# Altium PCB VCB2025_rev0.PcbDoc (part 2 of 3)
Units mm, origin at the board's own origin, x right, y up, seen from the top; angles counter-clockwise.
Board outline 146 x 96 mm, 2 copper layers (Top Layer, Bottom Layer); 173 components, 126 nets, 592 pads, 876 vias.
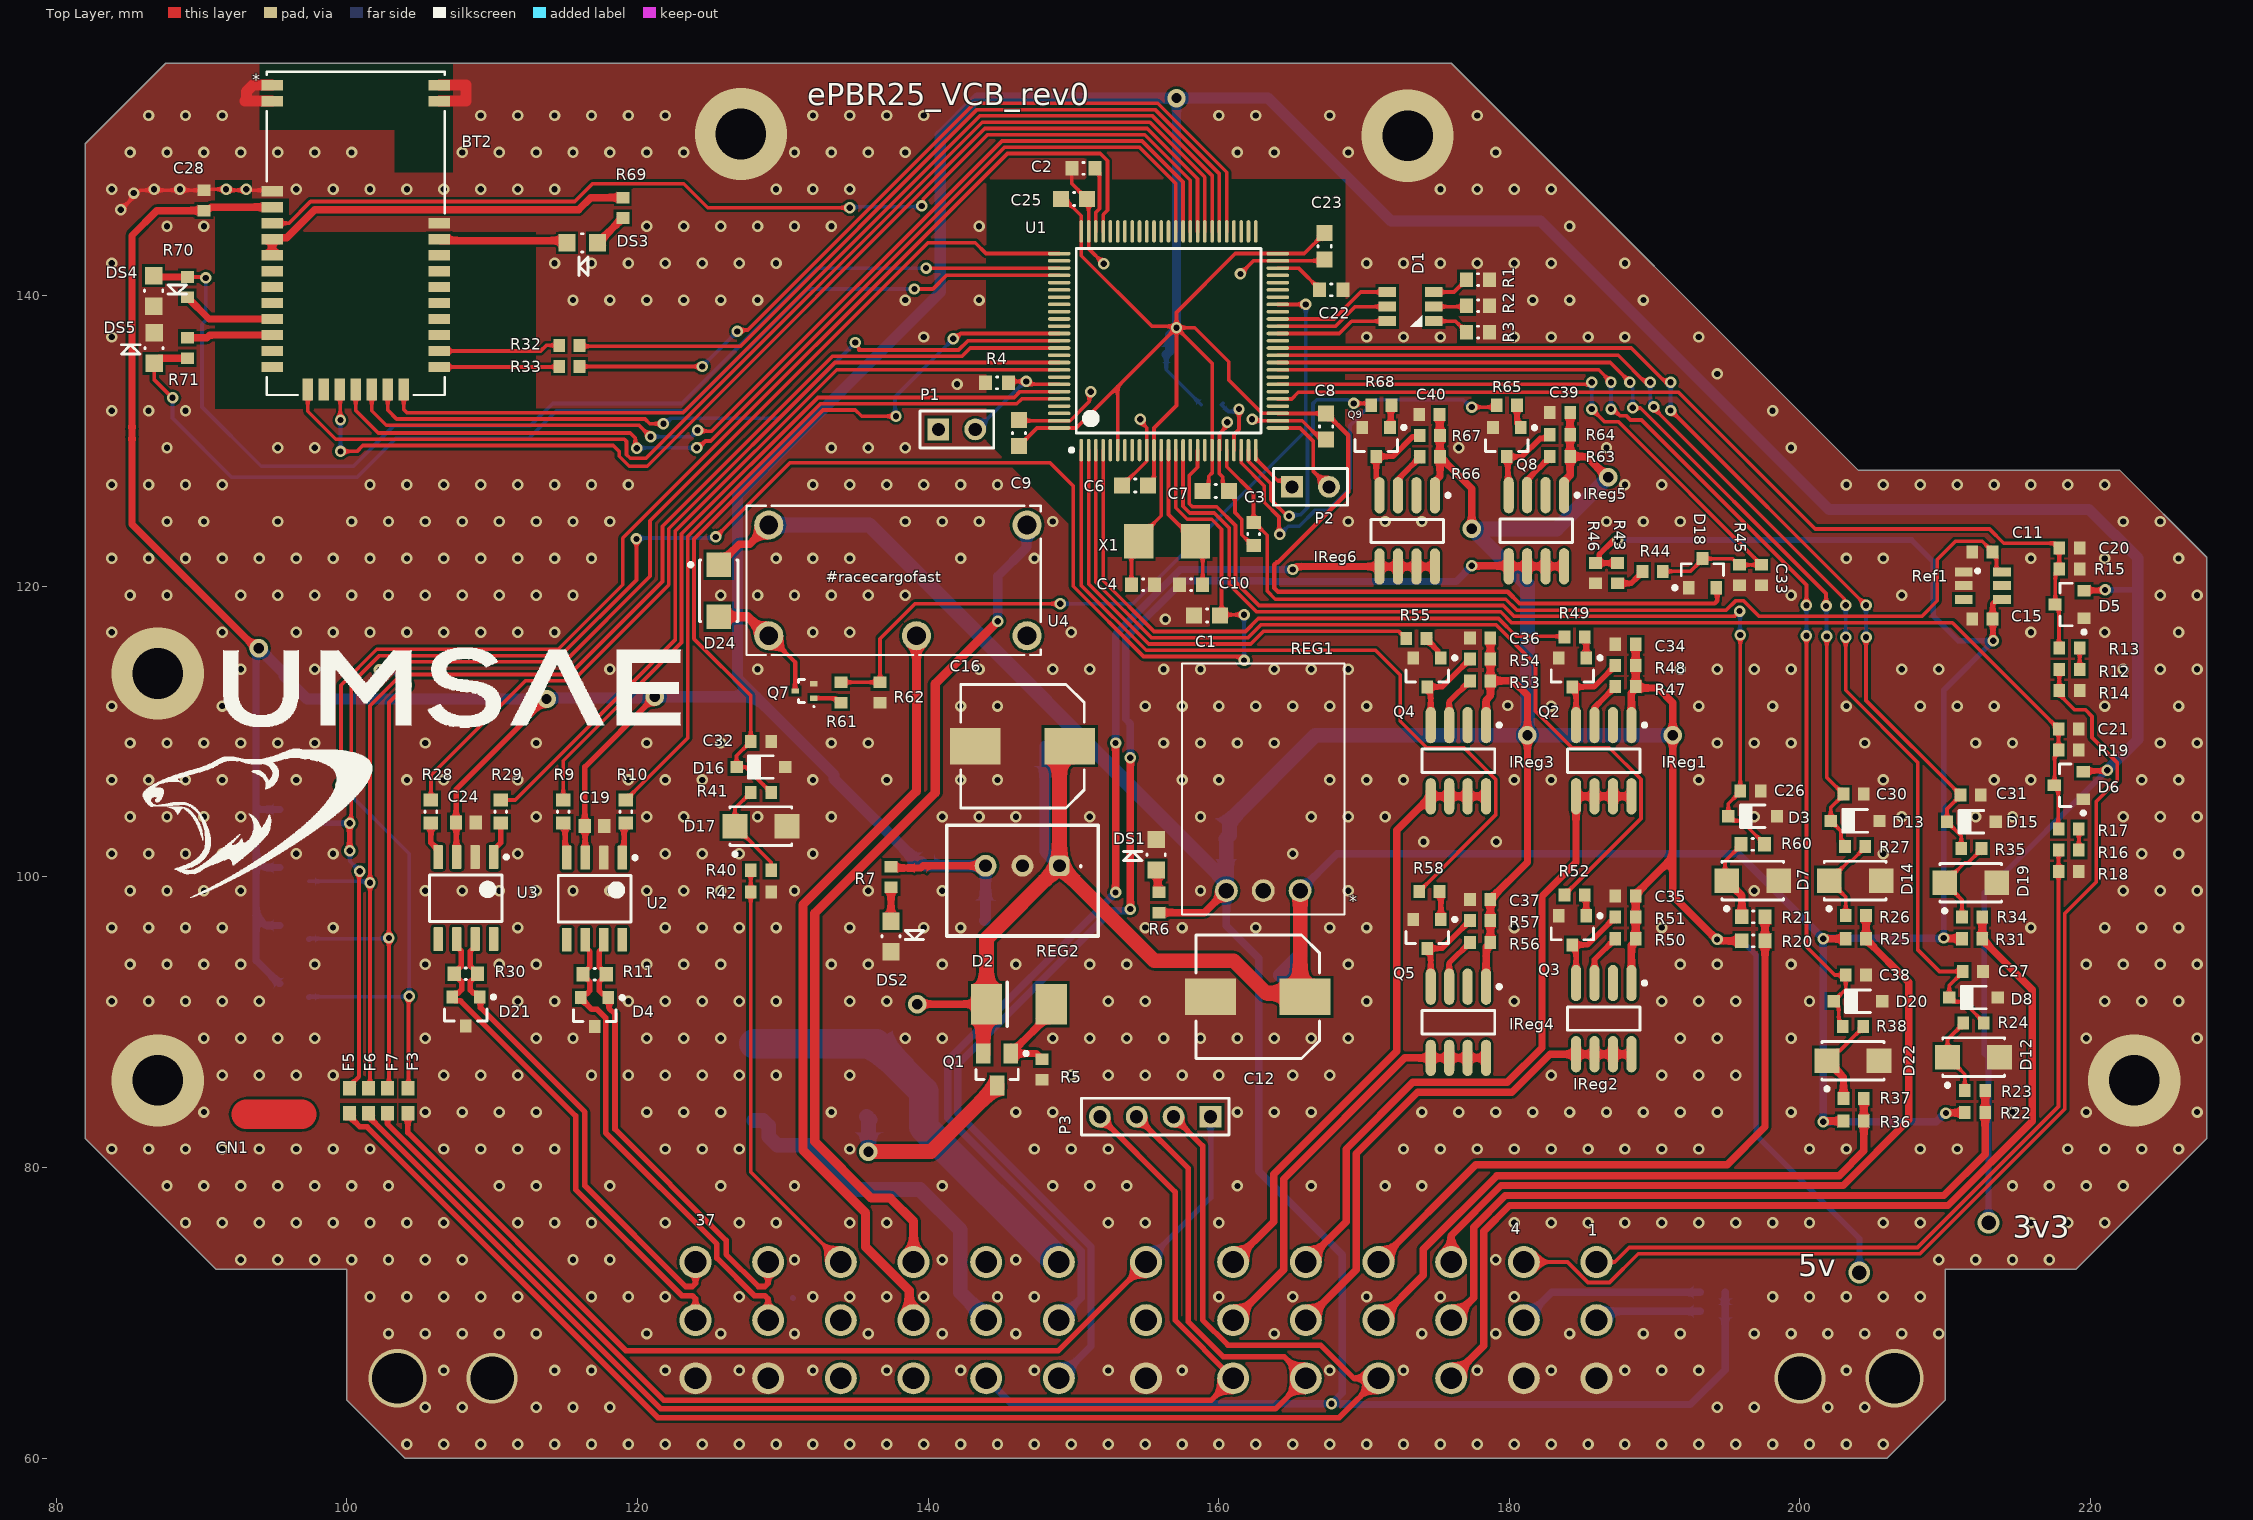
[diagram p0: Top Layer view]

## Part data (continued)
R6: "Resistor", Manufacturer=Yageo, Manufacturer Part Number=RC0603JR-07180RL, Operating Temperature="-55°C ~ 155°C", Package / Case="0603 (1608 Metric)", Power (Watts)="0.1W, 1/10W", Resistance (Ohms)=180, Supplier Device Package=0603, Supplier Part Number 1=311-180GRCT-ND, Temperature Coefficient=±100ppm/°C, Tolerance=±5%, Category=Resistors, ComponentLink1Description=http://www.yageo.com/NewPortal/yageodocoutput?fileName=/pdf/R-Chip/PYu-RC_Group_51_RoHS_L_4.pdf, ComponentLink1URL=http://www.yageo.com/NewPortal/yageodocoutput?fileName=/pdf/R-Chip/PYu-RC_Group_51_RoHS_L_4.pdf, Composition="Thick Film", Failure Rate=-, Features="Moisture Resistant", Height - Seated (Max)="0.022\" (0.55mm)", Number of Terminations=2, Packaging="Cut Tape (CT)", Part Status=Active, Pricing 1="1=0.16, 10=0.016, 25=0.0112, 50=0.0084, 100=0.0062, 250=0.0048, 500=0.00382, 1000=0.00281 (CAD)", RoHS="RoHS Compliant", Size / Dimension="0.063\" L x 0.031\" W (1.60mm x 0.80mm)", Stock 1=201936, Supplier 1=Digi-Key
R7: "Resistor", Manufacturer=Yageo, Manufacturer Part Number=RC0603JR-0782RL, Operating Temperature="-55°C ~ 155°C", Package / Case="0603 (1608 Metric)", Power (Watts)="0.1W, 1/10W", Resistance (Ohms)=82, Supplier Device Package=0603, Supplier Part Number 1=311-82GRCT-ND, Temperature Coefficient=±100ppm/°C, Tolerance=±5%, Category=Resistors, ComponentLink1Description=http://www.yageo.com/NewPortal/yageodocoutput?fileName=/pdf/R-Chip/PYu-RC_Group_51_RoHS_L_4.pdf, ComponentLink1URL=http://www.yageo.com/NewPortal/yageodocoutput?fileName=/pdf/R-Chip/PYu-RC_Group_51_RoHS_L_4.pdf, Composition="Thick Film", Failure Rate=-, Features="Moisture Resistant", Height - Seated (Max)="0.022\" (0.55mm)", Number of Terminations=2, Packaging="Cut Tape (CT)", Part Status=Active, Pricing 1="1=0.16, 10=0.016, 25=0.0112, 50=0.0084, 100=0.0062, 250=0.0048, 500=0.00382, 1000=0.00281 (CAD)", RoHS="RoHS Compliant", Size / Dimension="0.063\" L x 0.031\" W (1.60mm x 0.80mm)", Stock 1=72049, Supplier 1=Digi-Key
R8: library part CMP-1014-00050-1, "100R 0.25W 5% 1206 (3216 Metric)  SMD", Case-EIA=1206, Case-Metric=3216, Power="0.25 W", Tolerance="5 %", Technology=SMT
R9 R10 R28 R29: library part CMP-1012-00034-1, "22R 0.1W 5% 0603 (1608 Metric)  SMD", Case-EIA=0603, Case-Metric=1608, Power="0.1 W", Tolerance="5 %", Technology=SMT
R11 R30: library part CMP-1012-00052-1, "120R 0.1W 5% 0603 (1608 Metric)  SMD", Case-EIA=0603, Case-Metric=1608, Power="0.1 W", Tolerance="5 %", Technology=SMT
R12 R16: "Resistor", Manufacturer=Yageo, Manufacturer Part Number=RT0603BRD073K9L, Operating Temperature="-55°C ~ 155°C", Package / Case="0603 (1608 Metric)", Power (Watts)="0.1W, 1/10W", Resistance (Ohms)=3.9k, Supplier Device Package=0603, Supplier Part Number 1=YAG1656CT-ND, Temperature Coefficient=±25ppm/°C, Tolerance=±0.1%, Category=Resistors, ComponentLink1Description=http://www.yageo.com/documents/recent/PYu-RT_1-to-0.05_RoHS_L_6.pdf, ComponentLink1URL=http://www.yageo.com/documents/recent/PYu-RT_1-to-0.05_RoHS_L_6.pdf, Composition="Thin Film", Failure Rate=-, Features="Moisture Resistant", Height - Seated (Max)="0.022\" (0.55mm)", Number of Terminations=2, Packaging="Cut Tape (CT)", Part Status=Active, Pricing 1="1=0.55, 10=0.464, 25=0.3376, 50=0.2446, 100=0.1814, 250=0.1392, 500=0.10966, 1000=0.07592 (CAD)", RoHS="RoHS Compliant", Size / Dimension="0.063\" L x 0.031\" W (1.60mm x 0.80mm)", Stock 1=10688, Supplier 1=Digi-Key
R13 R17: "Resistor", Manufacturer=Yageo, Manufacturer Part Number=RT0603BRD071K3L, Operating Temperature="-55°C ~ 155°C", Package / Case="0603 (1608 Metric)", Power (Watts)="0.1W, 1/10W", Resistance (Ohms)=1.3k, Supplier Device Package=0603, Supplier Part Number 1=YAG1565CT-ND, Temperature Coefficient=±25ppm/°C, Tolerance=±0.1%, Category=Resistors, ComponentLink1Description=http://www.yageo.com/documents/recent/PYu-RT_1-to-0.05_RoHS_L_6.pdf, ComponentLink1URL=http://www.yageo.com/documents/recent/PYu-RT_1-to-0.05_RoHS_L_6.pdf, Composition="Thin Film", Failure Rate=-, Features="Moisture Resistant", Height - Seated (Max)="0.022\" (0.55mm)", Number of Terminations=2, Packaging="Cut Tape (CT)", Part Status=Active, Pricing 1="1=0.55, 10=0.464, 25=0.3376, 50=0.2446, 100=0.1814, 250=0.1392, 500=0.10966, 1000=0.07592 (CAD)", RoHS="RoHS Compliant", Size / Dimension="0.063\" L x 0.031\" W (1.60mm x 0.80mm)", Stock 1=2236, Supplier 1=Digi-Key
R14 R18 R22 R25 R31 R36 R46: "Resistor", Manufacturer=Yageo, Manufacturer Part Number=RC0603JR-0710KL, Operating Temperature="-55°C ~ 155°C", Package / Case="0603 (1608 Metric)", Power (Watts)="0.1W, 1/10W", Resistance (Ohms)=10k, Supplier Device Package=0603, Supplier Part Number 1=311-10KGRCT-ND, Temperature Coefficient=±100ppm/°C, Tolerance=±5%, Category=Resistors, ComponentLink1Description=http://www.yageo.com/NewPortal/yageodocoutput?fileName=/pdf/R-Chip/PYu-RC_Group_51_RoHS_L_4.pdf, ComponentLink1URL=http://www.yageo.com/NewPortal/yageodocoutput?fileName=/pdf/R-Chip/PYu-RC_Group_51_RoHS_L_4.pdf, Composition="Thick Film", Failure Rate=-, Features="Moisture Resistant", Height - Seated (Max)="0.022\" (0.55mm)", Number of Terminations=2, Packaging="Cut Tape (CT)", Part Status=Active, Pricing 1="1=0.16, 10=0.016, 25=0.0112, 50=0.0084, 100=0.0062, 250=0.0048, 500=0.00382, 1000=0.00281 (CAD)", RoHS="RoHS Compliant", Size / Dimension="0.063\" L x 0.031\" W (1.60mm x 0.80mm)", Stock 1=2936292, Supplier 1=Digi-Key
R15 R19 R45: "Resistor", Manufacturer=Yageo, Manufacturer Part Number=RT0603BRD0710KL, Operating Temperature="-55°C ~ 155°C", Package / Case="0603 (1608 Metric)", Power (Watts)="0.1W, 1/10W", Resistance (Ohms)=10k, Supplier Device Package=0603, Supplier Part Number 1=YAG1236CT-ND, Temperature Coefficient=±25ppm/°C, Tolerance=±0.1%, Category=Resistors, ComponentLink1Description=http://www.yageo.com/documents/recent/PYu-RT_1-to-0.05_RoHS_L_6.pdf, ComponentLink1URL=http://www.yageo.com/documents/recent/PYu-RT_1-to-0.05_RoHS_L_6.pdf, Composition="Thin Film", Failure Rate=-, Features="Moisture Resistant", Height - Seated (Max)="0.022\" (0.55mm)", Number of Terminations=2, Packaging="Cut Tape (CT)", Part Status=Active, Pricing 1="1=0.5, 10=0.42, 25=0.3048, 50=0.2212, 100=0.164, 250=0.12592, 500=0.0992, 1000=0.06867 (CAD)", RoHS="RoHS Compliant", Size / Dimension="0.063\" L x 0.031\" W (1.60mm x 0.80mm)", Stock 1=2958, Supplier 1=Digi-Key
R20 R21 R60: library part CMP-26527-002098-1, "10kΩ ±5% 0.1W 0603 Thick Film Chip Resistor AEC-Q200 compliant", Case Code (Imperial)=0603, Case Code (Metric)=1608, Max Operating Temperature=155°C, Max Power Dissipation=100mW, Min Operating Temperature=-55°C, Resistance=10kR, Resistor Type="Thick Film", Temperature Coefficient=100ppm/°C, Tolerance=5%, Case/Package=0603, Construction=Rectangular, Contact Plating=Tin, Depth=0.8mm, Features="Automotive AEC-Q200", Height=0.022inch, Lead Free="Lead Free", Length=1.55mm, Military Standard=Not, Mount="Surface Mount", Number of Terminations=2, Packaging="Tape and Reel", Power Rating=100mW, Radiation Hardening=No, Series=RMCF, Size Code=0603, Width=0.031inch
R23 R24 R26 R27 R34 R35 R37 R38: "Resistor", Manufacturer=Yageo, Manufacturer Part Number=RC0603JR-075K1L, Operating Temperature="-55°C ~ 155°C", Package / Case="0603 (1608 Metric)", Power (Watts)="0.1W, 1/10W", Resistance (Ohms)=5.1k, Supplier Device Package=0603, Supplier Part Number 1=311-5.1KGRCT-ND, Temperature Coefficient=±100ppm/°C, Tolerance=±5%, Category=Resistors, ComponentLink1Description=http://www.yageo.com/NewPortal/yageodocoutput?fileName=/pdf/R-Chip/PYu-RC_Group_51_RoHS_L_4.pdf, ComponentLink1URL=http://www.yageo.com/NewPortal/yageodocoutput?fileName=/pdf/R-Chip/PYu-RC_Group_51_RoHS_L_4.pdf, Composition="Thick Film", Failure Rate=-, Features="Moisture Resistant", Height - Seated (Max)="0.022\" (0.55mm)", Number of Terminations=2, Packaging="Cut Tape (CT)", Part Status=Active, Pricing 1="1=0.16, 10=0.016, 25=0.0112, 50=0.0084, 100=0.0062, 250=0.0048, 500=0.00382, 1000=0.00281 (CAD)", RoHS="RoHS Compliant", Size / Dimension="0.063\" L x 0.031\" W (1.60mm x 0.80mm)", Stock 1=782184, Supplier 1=Digi-Key
R32 R33 R69 R70 R71: "Resistor", Manufacturer=Yageo, Manufacturer Part Number=RC0603JR-0722RL, Operating Temperature="-55°C ~ 155°C", Package / Case="0603 (1608 Metric)", Power (Watts)="0.1W, 1/10W", Resistance (Ohms)=22, Supplier Device Package=0603, Supplier Part Number 1=311-22GRCT-ND, Temperature Coefficient=±100ppm/°C, Tolerance=±5%, Category=Resistors, ComponentLink1Description=http://www.yageo.com/NewPortal/yageodocoutput?fileName=/pdf/R-Chip/PYu-RC_Group_51_RoHS_L_4.pdf, ComponentLink1URL=http://www.yageo.com/NewPortal/yageodocoutput?fileName=/pdf/R-Chip/PYu-RC_Group_51_RoHS_L_4.pdf, Composition="Thick Film", Failure Rate=-, Features="Moisture Resistant", Height - Seated (Max)="0.022\" (0.55mm)", Number of Terminations=2, Packaging="Cut Tape (CT)", Part Status=Active, Pricing 1="1=0.16, 10=0.016, 25=0.0112, 50=0.0084, 100=0.0062, 250=0.0048, 500=0.00382, 1000=0.00281 (CAD)", RoHS="RoHS Compliant", Size / Dimension="0.063\" L x 0.031\" W (1.60mm x 0.80mm)", Stock 1=603781, Supplier 1=Digi-Key
R43: "Resistor", Manufacturer=Yageo, Manufacturer Part Number=RT0603BRD0739KL, Operating Temperature="-55°C ~ 155°C", Package / Case="0603 (1608 Metric)", Power (Watts)="0.1W, 1/10W", Resistance (Ohms)=39k, Supplier Device Package=0603, Supplier Part Number 1=YAG1649CT-ND, Temperature Coefficient=±25ppm/°C, Tolerance=±0.1%, Category=Resistors, ComponentLink1Description=http://www.yageo.com/documents/recent/PYu-RT_1-to-0.05_RoHS_L_6.pdf, ComponentLink1URL=http://www.yageo.com/documents/recent/PYu-RT_1-to-0.05_RoHS_L_6.pdf, Composition="Thin Film", Failure Rate=-, Features="Moisture Resistant", Height - Seated (Max)="0.022\" (0.55mm)", Number of Terminations=2, Packaging="Cut Tape (CT)", Part Status=Active, Pricing 1="1=0.55, 10=0.464, 25=0.3376, 50=0.2446, 100=0.1814, 250=0.1392, 500=0.10966, 1000=0.07592 (CAD)", RoHS="RoHS Compliant", Size / Dimension="0.063\" L x 0.031\" W (1.60mm x 0.80mm)", Stock 1=2740, Supplier 1=Digi-Key
R44: "Resistor", Manufacturer=Yageo, Manufacturer Part Number=AT0603BRD072KL, Operating Temperature="-55°C ~ 155°C", Package / Case="0603 (1608 Metric)", Power (Watts)="0.1W, 1/10W", Resistance (Ohms)=2k, Supplier Device Package=0603, Supplier Part Number 1=YAG2112CT-ND, Temperature Coefficient=±25ppm/°C, Tolerance=±0.1%, Category=Resistors, ComponentLink1Description=http://www.yageo.com/documents/recent/PYu-AT_51_RoHS_L-3.pdf, ComponentLink1URL=http://www.yageo.com/documents/recent/PYu-AT_51_RoHS_L-3.pdf, Composition="Thin Film", Failure Rate=-, Features="Anti-Sulfur, Automotive AEC-Q200, Moisture Resistant", Height - Seated (Max)="0.022\" (0.55mm)", Number of Terminations=2, Packaging="Cut Tape (CT)", Part Status=Active, Pricing 1="1=0.59, 10=0.431, 25=0.3188, 50=0.235, 100=0.1725, 250=0.14248, 500=0.11746, 1000=0.08498 (CAD)", RoHS="RoHS Compliant", Size / Dimension="0.063\" L x 0.032\" W (1.60mm x 0.80mm)", Stock 1=1218, Supplier 1=Digi-Key
R47 R50 R53 R56 R63 R66: "Resistor", Manufacturer=Yageo, Manufacturer Part Number=RC0603FR-072RL, Operating Temperature="-55°C ~ 155°C", Package / Case="0603 (1608 Metric)", Power (Watts)="0.1W, 1/10W", Resistance (Ohms)=2, Supplier Device Package=0603, Supplier Part Number 1=311-2.00HRCT-ND, Temperature Coefficient=±200ppm/°C, Tolerance=±1%, Category=Resistors, ComponentLink1Description=http://www.yageo.com/NewPortal/yageodocoutput?fileName=/pdf/R-Chip/PYu-RC_Group_51_RoHS_L_4.pdf, ComponentLink1URL=http://www.yageo.com/NewPortal/yageodocoutput?fileName=/pdf/R-Chip/PYu-RC_Group_51_RoHS_L_4.pdf, Composition="Thick Film", Failure Rate=-, Features="Moisture Resistant", Height - Seated (Max)="0.022\" (0.55mm)", Number of Terminations=2, Packaging="Cut Tape (CT)", Part Status=Active, Pricing 1="1=0.16, 10=0.03, 25=0.022, 50=0.0166, 100=0.0122, 250=0.00936, 500=0.00746, 1000=0.0055 (CAD)", RoHS="RoHS Compliant", Size / Dimension="0.063\" L x 0.031\" W (1.60mm x 0.80mm)", Stock 1=84378, Supplier 1=Digi-Key
R48 R51 R54 R57 R64 R67: "Resistor", Manufacturer=Yageo, Manufacturer Part Number=RC0603JR-07110KL, Operating Temperature="-55°C ~ 155°C", Package / Case="0603 (1608 Metric)", Power (Watts)="0.1W, 1/10W", Resistance (Ohms)=110k, Supplier Device Package=0603, Supplier Part Number 1=311-110KGRCT-ND, Temperature Coefficient=±100ppm/°C, Tolerance=±5%, Category=Resistors, ComponentLink1Description=http://www.yageo.com/NewPortal/yageodocoutput?fileName=/pdf/R-Chip/PYu-RC_Group_51_RoHS_L_4.pdf, ComponentLink1URL=http://www.yageo.com/NewPortal/yageodocoutput?fileName=/pdf/R-Chip/PYu-RC_Group_51_RoHS_L_4.pdf, Composition="Thick Film", Failure Rate=-, Features="Moisture Resistant", Height - Seated (Max)="0.022\" (0.55mm)", Number of Terminations=2, Packaging="Cut Tape (CT)", Part Status=Active, Pricing 1="1=0.16, 10=0.016, 25=0.0112, 50=0.0084, 100=0.0062, 250=0.0048, 500=0.00382, 1000=0.00281 (CAD)", RoHS="RoHS Compliant", Size / Dimension="0.063\" L x 0.031\" W (1.60mm x 0.80mm)", Stock 1=85509, Supplier 1=Digi-Key
Ref1: Current - Cathode=-, Current - Output=10mA, Current - Supply=600µA, Digikey Part Number=LT6654AHS6-3.3#TRMPBFCT-ND, Manufacturer="Linear Technology", Operating Temperature="-40°C ~ 125°C (TA)", Package / Case="SOT-23-6 Thin, TSOT-23-6", Supplier Device Package=TSOT-23-6, Temperature Coefficient=10ppm/°C, Tolerance=±0.05%, Voltage - Input="3.8 V ~ 36 V", Voltage - Output (Min/Fixed)=3.3V, Category="Integrated Circuits (ICs)", ComponentLink1Description=http://www.linear.com/docs/29677, ComponentLink1URL=http://www.linear.com/docs/29677, Digikey Link=http://www.digikey.com/product-detail/en/linear-technology/LT6654AHS6-3.3-TRMPBF/LT6654AHS6-3.3-TRMPBFCT-ND/2485839, Manufacturer Part Number=LT6654AHS6-3.3, Mounting Type="Surface Mount", Noise - 0.1Hz to 10Hz=1.7ppmp-p, Noise - 10Hz to 10kHz=2ppmrms, Output Type=Fixed, Packaging="Cut Tape (CT)", Part Status=Active, Pricing 1="1=9.53, 25=8.508, 100=5.5596, 250=5.1048 (CAD)", Reference Type=Series, RoHS="RoHS Compliant", Stock 1=1315, Supplier 1=Digi-Key, Supplier Part Number 1=LT6654AHS6-3.3#TRMPBFCT-ND, Voltage - Output (Max)=-
REG1: "5V DCDC", Current - Output (Max)=1.5A, Manufacturer="Murata Power Solutions Inc.", Manufacturer Part Number=OKI-78SR-3.3/1.5-W36H-C, Operating Temperature="-40°C ~ 85°C", Package / Case="3-SIP Module", Power (Watts) - Manufacture Series=5W, Supplier Part Number 1=811-2196-5-ND, Voltage - Input (Max)=36V, Voltage - Input (Min)=7V, Voltage - Isolation=-, Voltage - Output 1=5V, Applications="ITE (Commercial)", Category="Power Supplies - Board Mount", ComponentLink1Description=http://power.murata.com/data/power/oki-78sr.pdf, ComponentLink1URL=http://power.murata.com/data/power/oki-78sr.pdf, Efficiency=85.5%, Features=SCP, Mounting Type="Through Hole", Number of Outputs=1, Packaging=Tray, Part Status=Active, Pricing 2="1=6.31, 5=6.248, 10=6.205, 25=6.1168, 50=5.9262, 100=5.5449, 250=5.28716 (CAD)", RoHS="RoHS Compliant", Size / Dimension="0.65\" L x 0.41\" W x 0.30\" H (16.5mm x 10.4mm x 7.6mm)", Stock 2=4108, Supplier 1=Digi-Key, Supplier 2=Digi-Key, Supplier Part Number 2=811-3014-ND, Type="Linear Regulator Replacement", Voltage - Output 2=-, Voltage - Output 3=-
REG2: library part OKI-78SR-5, "3.3V DCDC", Current - Output (Max)=1.5A, Manufacturer="Murata Power Solutions Inc.", Manufacturer Part Number=OKI-78SR-3.3/1.5-W36H-C, Operating Temperature="-40°C ~ 85°C", Package / Case="3-SIP Module", Power (Watts) - Manufacture Series=5W, Supplier Part Number 1=811-2196-5-ND, Voltage - Input (Max)=36V, Voltage - Input (Min)=7V, Voltage - Isolation=-, Voltage - Output 1=3.3V, Applications="ITE (Commercial)", Category="Power Supplies - Board Mount", ComponentLink1Description=http://power.murata.com/data/power/oki-78sr.pdf, ComponentLink1URL=http://power.murata.com/data/power/oki-78sr.pdf, Efficiency=85.5%, Features=SCP, Mounting Type="Through Hole", Number of Outputs=1, Packaging=Tray, Part Status=Active, Pricing 2="1=6.31, 5=6.248, 10=6.205, 25=6.1168, 50=5.9262, 100=5.5449, 250=5.28716 (CAD)", RoHS="RoHS Compliant", Size / Dimension="0.65\" L x 0.41\" W x 0.30\" H (16.5mm x 10.4mm x 7.6mm)", Stock 2=4108, Supplier 1=Digi-Key, Supplier 2=Digi-Key, Supplier Part Number 2=811-3014-ND, Type="Linear Regulator Replacement", Voltage - Output 2=-, Voltage - Output 3=-
U1: library part CMP-0243-00221-1, "ARM Cortex-M4 32-bit MCU+FPU, 512 KB Flash, 128 KB Internal RAM, 81 I/Os, 100-Pin LQFP, -40 to 105 degC, Tray", I/Os (High Current)=81, Operating Frequency(F) (Processor speed) (MHz)=180, Package Description=LQFP100, Package Reference="100-Pin Low Profile Quad Flat Package, Body 14 x 14 mm, Pitch 0.5 mm", Supply Voltage(Vcc) min (V)=1.7, ComponentLink1Description="Manufacturer URL", ComponentLink1URL=http://www.st.com/, ComponentLink2Description=Datasheet, ComponentLink2URL=http://www.st.com/st-web-ui/static/active/en/resource/technical/document/datasheet/DM00141306.pdf, Core="ARM Cortex-M4", D/A Converter=2, DatasheetVersion="Rev. 6", FLASH Size (Prog) (kB)=512, Internal RAM Size (kB)=128, Mounting Technology="Surface Mount", Packing=Tray, PartId=1
U2 U3: library part CMP-0315-00075-2, "3.3 V Can Transceiver, 17 mA, -40 to 85 degC, 8-pin SOIC (D), Green (RoHS & no Sb/Br)", Drivers Per Package=1, Manufacturer="Texas Instruments", Rating=Catalog, Supply Voltage(s)(V)=3.3, Code_JEDEC=MS-012AA, ComponentLink1Description=Datasheet, ComponentLink1URL=http://www.ti.com/general/docs/lit/getliterature.tsp?genericPartNumber=SN65HVD232&fileType=pdf, DatasheetVersion=SLOS346K, Eco-Plan="Green (RoHS & no Sb/Br)", ICC(Max)(mA)=17, Isolated=No, Mounting Technology="Surface Mount", PackageDescription="8-Pin Plastic Small Outline Integrated Circuit, 4.9 x 3.9 mm, Pitch 1.27 mm Pitch", PackageReference=D0008A, PackageVersion="revM, Jun-2011", PartNumber=SN65HVD232DR, Receivers Per Package=1, SubFamily=CAN, Transient Pulse Protection(V)="-25 to 25"
U4: Mfr_Name="Tyco Electronics", Copyright="Copyright (C) 2021 Ultra Librarian. All rights reserved.", Digi-Key_Part_Number_1=PB353-ND, Digi-Key_Part_Number_2=PB353-NDL, Manufacturer_Part_Number=PE014005
X1: library part "8MHz crystal, 7A-8.000MAAJ-T", ESR (Equivalent Series Resistance)="80 Ohm", Frequency=8MHz, Frequency Stability=±30ppm, Load Capacitance=18pF, Manufacturer="TXC CORPORATION", Operating Mode=Fundamental, Operating Temperature="-20°C ~ 70°C", Package / Case="2-SMD, No Lead", Ratings=-, Supplier Part Number 1=XC2103CT-ND, Category="Crystals, Oscillators, Resonators", ComponentLink1Description=http://www.txccrystal.com/images/pdf/7a.pdf, ComponentLink1URL=http://www.txccrystal.com/images/pdf/7a.pdf, Frequency Tolerance=±30ppm, Height - Seated (Max)="0.053\" (1.35mm)", Manufacturer Part Number=7A-8.000MAAJ-T, Mounting Type="Surface Mount", Packaging="Cut Tape (CT)", Part Status=Active, Pricing 1="1=1.12, 10=0.989, 50=0.9234, 100=0.8162, 500=0.77322 (CAD)", RoHS="RoHS Compliant", Size / Dimension="0.197\" L x 0.126\" W (5.00mm x 3.20mm)", Stock 1=30692, Supplier 1=Digi-Key, Type="MHz Crystal"

## Via types
v1: diameter 0.787, hole 0.432, Top Layer to Bottom Layer, 855 vias
v2: diameter 1.27, hole 0.711, Top Layer to Bottom Layer, 10 vias
v3: diameter 6.35, hole 3.48, Top Layer to Bottom Layer, 5 vias
v4: diameter 4, hole 3.5, Top Layer to Bottom Layer, 2 vias
v5: diameter 3.5, hole 3, Top Layer to Bottom Layer, 2 vias
v6: diameter 1.5, hole 1, Top Layer to Bottom Layer, 2 vias

## Nets (pads, with @x,y where several pads share a name; then routed paths per layer and width w, separated by ;. In a path a pad name is that pad's centre, name@x,y a point inside that pad or via, vN(x,y) a via of type N, cw(c..) or ccw(c..) an arc to the next point about the centre after c; other vN are vias at no path point)
3v3: BT2.4 C5.2 C6.2 C7.2 C8.2 C9.2 C18.2 C19.2 C23.2 C24.2 C25.2 C28.2 D5.2 D6.2 D9.2 D10.2 D11.2 D18.2 D23.2 L1.1 R7.1 R8.2 REG2.3 U1.6 U1.11 U1.19 U1.28 U1.50 U1.75 U1.100 U2.3 U3.3 | length 515.2
  Top Layer w0.254: C9.2@146.25,129.65 147.5,130.9 U1.100@149.025,130.9 150.2,130.9 153.05,133.75 ; C25.2@148.85,146.654 149.004,146.5 149.55,146.5 150.552,145.498 150.552,144.427 U1.75@150.55,144.425 150.552,144.423 150.552,142.748 155.408,137.892 157.008,137.892 157.008,137.708 153.05,133.75 ; U1.6@153.05,129.375 153.05,133.75 ; C6.2@155.15,126.95 155.55,127.35 U1.11@155.55,129.375 155.55,130.9 157.1,132.45 v1(157.1,137.8) ; C7.2@158.9,126.55 159.323,126.973 159.323,127.573 159.55,127.8 U1.19@159.55,129.375 159.55,135.35 v1(157.1,137.8) ; C23.2@167.3,144.304 165.896,142.9 U1.50@164.075,142.9 161.15,142.9 157.1,138.85 v1(157.1,137.8) ; C8.2@167.4,131.55 167.05,131.9 U1.28@164.075,131.9 164.073,131.902 162.998,131.902 160.699,134.201 160.699,135.451 158.35,137.8 v1(157.1,137.8)
  Top Layer w0.305: C8.2@167.4,131.9 168.91,130.39 168.91,126.492 164.084,121.666 164.009,121.666 163.83,121.487 163.83,119.888 164.084,119.634 179.891,119.634 180.703,118.821 194.131,118.821 194.31,119 D18.2@194.31,119.804
  Top Layer w0.381: U3.3@107.561,101.371 107.541,101.391 107.541,103.73 C24.2@107.521,103.75 107.521,106.021 v2(113.748,112.247) ; U2.3@116.419,101.329 116.399,101.349 116.399,103.489 C19.2@116.379,103.509 116.379,107.579 v2(121.2,112.4) ; D6.2@219.5,107.25 219.55,107.3 221.1,107.3 v1(221.15,107.35) ; D5.2@219.55,119.7 219.575,119.725 220.975,119.725 v1(221,119.75)
  Top Layer w0.508: v2(93.941,115.75) 93.75,115.75 85.217,124.283 85.217,130.556 85.217,144.145 86.93,145.858 C28.2@90.17,145.858 90.316,146.004 90.574,146.004 90.664,146.093 BT2.4@94.869,146.093 ; R7.1@137.45,100.7 137.535,100.615 139.5,100.615 139.655,100.77 REG2.3@143.96,100.77
  Bottom Layer w0.254: C5.2@156.4,135.95 156.4,134.9 L1.1@158.8,132.5
  Bottom Layer w0.381: v6(212.979,76.2) 212.979,87.562 212.7,87.841 212.7,98.9 v1(221.15,107.35) ; v1(221,119.75) 223.15,119.75 223.25,119.85
  Bottom Layer w0.508: v2(93.941,115.75) 93.754,115.563 93.754,110.171 93.75,110.168 93.75,104.9 ; D23.2@95.4,92.671 95.35,92.671 93.8,94.221 93.75,94.221 93.75,97.35 ; D11.2@95.4,96.661 94.439,96.661 93.75,97.35 ; D10.2@95.4,100.65 94.4,100.65 93.75,101.3 ; D9.2@95.4,104.639 94.011,104.639 93.75,104.9 ; 93.75,97.35 93.75,101.3 ; 93.75,101.3 93.75,104.9
  Bottom Layer w0.635: C5.2@156.4,135.95 156.633,136.183 156.633,137.291 157.1,137.759 v1(157.1,137.8) v2(157.1,153.6)
  Bottom Layer w0.762: v2(93.941,115.75) 95.677,114.014 95.677,113.823 97.253,112.247 v2(113.748,112.247) 113.824,112.324 121.124,112.324 v2(121.2,112.4) 128.15,112.4 ; C18.2@143.9,97 143.96,97.06 REG2.3@143.96,100.77 139.78,100.77 R8.2@139.5,101.05 139.225,101.05 133.541,106.735 133.541,107.01 128.15,112.4 ; v1(221.15,107.35) 223.25,109.45 223.25,119.85 223.25,121.95 219.9,125.3 202,125.3 182.15,145.15 171.85,145.15 163.4,153.6 v2(157.1,153.6) 143.4,153.6 140.843,151.043 140.843,140.243 126.9,126.3 126.9,113.65 128.15,112.4
3v3ref: C3.2 C11.2 Ref1.6 U1.21 | length 67.9
  Top Layer w0.254: U1.21@160.55,129.375 160.552,129.373 160.552,128.229 162.4,126.381 C3.2@162.4,124.4 162.45,124.4 163.337,123.513 163.337,119.677 163.9,119.114 179.764,119.114 180.514,118.364 194.926,118.364 195.561,118.998 196.139,118.998 197.206,117.932 208.382,117.932 209.45,119 209.45,121.85 210.709,123.109 212.545,123.109 213.25,122.404 C11.2@213.25,122.354 213.523,122.081 213.523,121.183 213.706,121 Ref1.6@213.9,121
5v: C14.2 C34.2 C35.2 C36.2 C37.2 C39.2 C40.2 CN1.27 D24.2 F1.1 F2.1 IReg1.1 IReg2.1 IReg3.1 IReg4.1 IReg5.1 IReg6.1 R6.1 R20.2 R47.1 R48.1 R50.1 R51.1 R53.1 R54.1 R56.1 R57.1 R63.1 R64.1 R66.1 R67.1 REG1.3 U4.A2 | length 329
  Top Layer w0.508: D24.2@125.6,121.49 125.6,121.5 127.008,122.908 127.728,122.908 U4.A2@129.04,124.22 ; R6.1@155.904,97.55 159.018,97.55 REG1.3@160.528,99.06 ; IReg6.1@174.879,126.263 174.879,127.215 175.23,127.566 R66.1@175.23,128.917 ; C40.2@175.198,131.826 175.214,131.81 175.214,130.388 R67.1@175.23,130.372 R66.1@175.23,128.917 ; v2(177.419,123.952) 177.419,126.729 R66.1@175.23,128.917 ; IReg4.1@178.405,92.45 178.405,95.205 R56.1@178.7,95.5 R57.1@178.7,97 C37.2@178.7,98.454 181.25,101.004 v2(181.25,109.75) 181.25,112.5 180.25,113.5 R53.1@178.7,113.5 ; IReg3.1@178.405,110.45 178.405,112.155 178.7,112.45 R53.1@178.7,113.5 ; C36.2@178.7,116.454 R54.1@178.7,115 R53.1@178.7,113.5 ; IReg5.1@183.769,126.275 183.769,127.227 184.186,127.644 R63.1@184.186,128.929 ; C39.2@184.186,131.953 R64.1@184.186,130.429 R63.1@184.186,128.929 ; v2@186.748,127.508 185.327,128.929 R63.1@184.186,128.929 ; IReg2.1@188.405,92.95 188.405,95.309 188.7,95.604 188.7,97.059 R51.1@188.7,97.25 188.7,98.8 191.25,101.35 ; IReg1.1@188.405,110.45 188.405,112.655 188.75,113 190.25,113 191.25,112 v2(191.25,109.75) 191.25,101.35 ; R47.1@188.7,113.5 C34.2@188.7,116.013 ; R20.2@196,95.6 194.35,95.6 191.25,98.7 191.25,101.35
  Top Layer w1.016: v2@186.748,127.508 v2(186.817,127.508)
  Bottom Layer w0.381: v1(194.3,95.7) 194.4,95.6 196,95.6 197,94.6 197,82.208 204.1,75.108 204.1,72.782 v6(204.089,72.771)
  Bottom Layer w0.508: CN1.27@144,65.5 145.746,63.754 v1(167.767,63.754) ; REG1.3@160.528,99.06 160.528,96.633 162.75,94.411 162.75,79.75 168.5,74 168.5,64.487 v1(167.767,63.754) ; 168.544,63.7 169.55,63.7 192.45,63.7 194.85,66.1 F1.1@194.85,70.113 F2.1@194.85,71.42 ; 168.993,63.754 v1(167.767,63.754)
  Bottom Layer w1.016: U4.A2@129.04,124.22 135.95,124.22 REG1.3@160.421,99.749 ; REG1.3@160.528,99.06 160.515,99.073 160.515,102.603 C14.2@160.502,102.616 160.744,102.858 160.744,103.848 166.646,109.75 v2(181.25,109.75) ; v2(186.817,127.508) 183.261,123.952 v2(177.419,123.952) 181.25,120.121 v2(181.25,109.75) ; v2(191.25,109.75) v2(181.25,109.75)
"\B\r\a\k\e\ \P\r\e\s\s": CN1.10 R20.1 R21.1 | length 44.9
  Top Layer w0.508: CN1.10@171,73.5 177.7,80.2 195,80.2 197.6,82.8 R20.1@197.6,95.6 R21.1@197.6,97.25
"APPS 1 5V": CN1.1 R16.1 R18.2 | length 53.9
  Top Layer w0.254: CN1.1@186,73.5 187.25,73.5 188.25,74.5 208.09,74.5 217.8,84.21 R18.2@217.8,100.387 R16.1@217.8,101.841
"APPS 1 Pwr": CN1.2 F1.2 | length 7.4
  Bottom Layer w0.508: CN1.2@186,69.5 186.613,70.113 F1.2@193.15,70.113
"APPS 2 5V": CN1.4 R12.1 R14.2 | length 76.9
  Top Layer w0.254: CN1.4@181,73.25 CN1.4@181,73.5 184.013,73.5 185.418,72.095 186.895,72.095 188.868,74.068 208.269,74.068 218.232,84.031 218.232,97.482 220.4,99.65 220.4,105.2 221.848,106.648 221.848,107.85 220.1,109.599 220.1,111.05 219.65,111.5 218.9,111.5 217.85,112.55 R14.2@217.85,112.837 R12.1@217.85,114.291
"APPS 2 Pwr": CN1.5 F2.2 | length 12.9
  Bottom Layer w0.508: CN1.5@181,69.5 182.92,71.42 F2.2@193.15,71.42
BOOT0: P1.2 R4.1 U1.94 | length 8.9
  Top Layer w0.254: P1.2@143.25,130.8 P1.2@143.601,131.151 ; R4.1@145.55,134 145.65,134.1 v1(146.75,134.1) ; v1@146.75,133.9 U1.94@149.025,133.9
  Bottom Layer w0.254: P1.2@143.25,130.8 143.35,130.8 146.65,134.1 v1(146.75,134.1)
"BPS Interm": D7.2 R21.2 R60.1 | length 5.9
  Top Layer w0.254: D7.2@194.96,99.75 194.85,99.86 194.85,101.087 195.95,102.187 R60.1@195.95,102.237
  Top Layer w0.508: D7.2@194.96,99.75 194.97,99.75 196,98.72 R21.2@196,97.25